# Allegro board SUB_TP2815_MCSI_V1_0_0418_1649.brd

Outline 52 x 66.97 mm; copper layers: TOP, L2GND, L3, BOTTOM. Coordinates in mm from the lower left corner of the outline.
Outline path: 0,66.97 0,0 52,0 52,66.97 0,66.97

## Design rules (mm)
net group MCSIA-CLKN: nets MCSIA-CLKN N16669400
net group MCSIA-CLKP: nets MCSIA-CLKP N16669297
net group MCSIA-D0N: nets MCSIA-D0N N16669496
net group MCSIA-D0P: nets MCSIA-D0P N16669492
net group MCSIA-D1N: nets MCSIA-D1N N16669588
net group MCSIA-D1P: nets MCSIA-D1P N16669584
net group MCSIA-D2N: nets MCSIA-D2N N16669680
net group MCSIA-D2P: nets MCSIA-D2P N16669676
net group MCSIA-D3N: nets MCSIA-D3N N16669772
net group MCSIA-D3P: nets MCSIA-D3P N16669768
net group VDD-IO-3V3: nets N16769015 VDD-IO-3V3
net group VIN1: nets N16649943 VIN1
net group VIN2: nets N16657022 VIN2
net group VIN3: nets N16657104 VIN3
net group VIN4: nets N16657188 VIN4

## Placement (name value [footprint] x y rotation side)
C1  100nF  [C0402]  24.83 38.8 270 bottom
C2  100nF  [C0402]  21.25 34.18 270 top
C3  100nF  [C0402]  23.43 28.52 270 bottom
C4  100nF  [C0402]  22.42 34.18 270 top
C5  100nF  [C0402]  30.9 38.83 270 bottom
C6  100nF  [C0402]  28.9 38.83 270 bottom
C7  100nF  [C0402]  26.89 38.83 270 bottom
C8  100nF  [C0402]  26.05 28.39 270 bottom
C9  100nF  [C0402]  27.4 28.39 270 bottom
C10  100nF  [C0402]  28.72 28.42 270 bottom
C11  100nF  [C0402]  29.91 28.42 270 bottom
C12  100nF  [C0402]  32.3 36.87 180 bottom
C13  NC/1uF  [C0402]  11.01 36.37 270 top
C14  NC/1uF  [C0402]  16.2 35.98 270 top
C15  100nF  [C0402]  22.42 36.19 270 top
C16  100nF  [C0402]  21.25 36.19 270 top
C17  100nF  [C0402]  34.74 32.89 0 bottom
C18  100nF  [C0402]  35.09 31.24 90 top
C19  100nF  [C0402]  34.74 34.08 0 bottom
C20  100nF  [C0402]  34.74 35.25 0 bottom
C21  100nF  [C0402]  24.98 41.06 90 bottom
C22  100nF  [C0402]  24.1 41.06 90 bottom
C23  100nF  [C0402]  30.06 41.06 90 bottom
C24  100nF  [C0402]  27.91 41.06 90 bottom
C25  100nF  [C0402]  26.13 41.06 90 bottom
C26  100nF  [C0402]  31.97 41.06 90 bottom
C27  NC/100nF  [C0402]  11.01 34.46 90 top
C28  100nF  [C0402]  31.18 28.36 270 bottom
C29  100nF  [C0402]  21.73 32.84 180 top
C30  100nF  [C0402]  22.14 29.58 270 bottom
C31  100nF  [C0402]  33.62 36.8 90 bottom
C32  100nF  [C0402]  35.6 29.33 90 top
C33  100nF  [C0402]  30.95 42.33 270 top
C34  100nF  [C0402]  31.84 42.33 270 top
C35  100nF  [C0402]  29.05 42.33 270 top
C36  100nF  [C0402]  26.06 52.32 90 top
C37  100nF  [C0402]  29.94 42.33 270 top
C38  100nF  [C0402]  38.69 52.32 90 top
C39  100nF  [C0402]  26.76 42.33 270 top
C40  100nF  [C0402]  27.78 42.33 270 top
C41  100nF  [C0402]  24.35 42.36 270 top
C42  100nF  [C0402]  25.24 42.36 270 top
C43  NC/100nF  [C0402]  21.43 30.78 180 top
C44  100nF  [C0402]  14.18 52.79 90 top
C45  100nF  [C0402]  4.54 46.95 90 top
C46  NC/100nF  [C0402]  36.72 23.84 180 top
C47  NC/20PF  [C0402]  34.99 25.42 90 top
C48  NC/20PF  [C0402]  35.02 27.32 270 top
C49  10uF  [C0402]  41.01 19.65 270 top
CC1  100nF  [C0402]  24.37 14.19 0 top
CC2  10uF  [C0402]  24.37 13.3 0 top
CC3  100nF  [C0402]  23.38 11.78 0 top
CC4  100nF  [C0402]  20.44 11.83 0 top
CC5  10uF  [C0603]  20.11 12.87 0 top
CC6  100nF  [C0402]  16.64 11.62 0 top
CC7  10uF  [C0603]  16.42 12.72 0 top
CP1  22uF-6.3V  [C0805]  21 38.98 0 top
CP2  22uF-6.3V  [C0805]  23.97 26.08 90 top
CP3  22uF-6.3V  [C0805]  19.02 34.56 0 top
CP4  22uF-6.3V  [C0805]  19.02 36.62 0 top
CP5  22uF-6.3V  [C0805]  38.01 35.48 180 top
CP6  22uF-6.3V  [C0805]  21 40.63 0 top
CP7  22uF-6.3V  [C0805]  18.48 27.96 180 top
CP8  22uF-6.3V  [C0805]  36.92 29.86 270 top
ESD1  ST5VLBD322  [SOD130_175H101]  44.29 46.74 180 top
ESD2  ST5VLBD322  [SOD130_175H101]  31.97 46.91 180 top
ESD3  ST5VLBD322  [SOD130_175H101]  19.65 47.03 180 top
ESD4  ST5VLBD322  [SOD130_175H101]  7.42 46.99 180 top
FB1  600R@100M-1A  [L0603]  15.59 39.59 0 top
FB2  600R@100M-1A  [L0603]  21.68 27.04 0 top
FB3  600R@100M-1A  [L0603]  19.17 33.14 0 top
FB4  600R@100M-1A  [L0603]  15.56 38.27 0 top
FB5  600R@100M-1A  [L0603]  37.79 34.03 180 top
FB6  600R@100M-1A  [L0603]  15.71 41.57 0 top
FB7  600R@100M-1A  [L0603]  15.38 27.93 0 top
FB8  600R@100M-1A  [L0603]  38.5 29.63 270 top
FB9  90@100M  [R0805]  20.74 15.21 90 top
FB10  90@100M  [R0805]  17.39 15 90 top
FB11  120R@100M-1A  [L0603]  26.12 48.62 270 bottom
FB12  120R@100M-1A  [L0603]  26.18 54.6 90 top
FB13  NC/60R@100M  [L0603]  37 22.78 180 top
H1  NC-HOLE  [MTH635D320]  43.79 5.24 0 top
H2  NC-HOLE  [MTH635D320]  8.21 21.01 0 top
J1  DIP  [BMW8B600_1890H700]  44.55 58.46 180 top
J2  DIP  [BMW8B600_1890H700]  32.27 58.46 180 top
J3  DIP  [BMW8B600_1890H700]  19.99 58.46 180 top
J4  DIP  [BMW8B600_1890H700]  7.71 58.46 180 top
JC1  DF40C-90DP-0.4V(58)  [SED90P40B185_1952H114-P]  26 13.12 180 bottom
NOREF  -  [unnamed]  49.93 3.93 0 top
NOREF#2  -  [#2]  6.7 2.96 0 top
NOREF#3  -  [#2]  -11.21 -26.5 0 top
NOREF#4  -  [#2]  0 66.97 0 top
NOREF#5  -  [unnamed]  2.05 57.35 0 top
NOREF#6  -  [#2]  52 0 90 top
NOREF#7  -  [unnamed]  4.03 5.25 0 top
NOREF#8  -  [#2]  -0.42 -5.42 0 top
NOREF#9  -  [unnamed]  49.04 63.26 0 top
NOREF#10  -  [unnamed]  4.03 5.25 180 bottom
NOREF#11  -  [unnamed]  2.05 57.35 180 bottom
NOREF#12  -  [unnamed]  49.04 63.26 180 bottom
NOREF#13  -  [unnamed]  49.93 3.93 180 bottom
OSC1  NC/27MHz/3225/20ppm  [X4B250_320H120_SMD]  37.07 26.18 180 top
Q1  BSN20  [SOT3P95B130_290H103]  43.25 26.89 270 top
Q2  BSN20  [SOT3P95B130_290H103]  43.21 31.73 180 top
Q3  MMBT3904  [SOT3P95B130_290H103]  43.24 22.46 270 top
R1  NC/1K  [R0402]  10.13 35.1 90 top
R2  24.9R  [R0402]  26.25 26.46 90 top
R3  24.9R  [R0402]  25.37 26.46 90 top
R4  24.9R  [R0402]  27.52 24.43 90 top
R5  24.9R  [R0402]  26.64 24.43 90 top
R6  24.9R  [R0402]  28.79 26.59 90 top
R7  24.9R  [R0402]  27.91 26.59 90 top
R8  24.9R  [R0402]  30.32 24.55 90 top
R9  24.9R  [R0402]  29.43 24.55 90 top
R10  24.9R  [R0402]  31.84 26.46 90 top
R11  24.9R  [R0402]  30.95 26.46 90 top
R12  100R  [R0402]  21.43 31.67 0 top
R13  100R  [R0402]  21.4 29.43 0 top
R14  22R  [R0402]  33.24 27.27 270 bottom
R15  NC/0R  [R0402]  33.67 27.76 0 top
R16  NC/0R  [R0402]  32.96 26.26 270 top
R17  NC/4.7K  [R0402]  36.03 37.15 0 bottom
R18  NC/4.7K  [R0402]  36.03 38.04 0 bottom
R19  NC/4.7K  [R0402]  42.87 29.08 0 top
R20  4.7K  [R0402]  18.79 31.24 270 top
R21  4.7K  [R0402]  36.03 37.15 180 top
R22  4.7K  [R0402]  36.03 38.04 180 top
R23  NC/22R  [R0402]  33.37 24.81 0 top
R24  NC/1M  [R0402]  33.8 26.26 90 top
R25  NC/0R  [R0402]  19.68 31.24 90 top
R26  NC/4.7K  [R0402]  45.42 31.82 270 top
R27  4.7K  [R0402]  19.24 29.43 180 top
R28  4.7K  [R0402]  41.01 23.51 90 top
R29  10K  [R0402]  45.76 23.84 90 top
R30  4.7K  [R0402]  43.55 19.2 0 top
R31  0R  [R0402]  43.55 20.08 180 top
R32  NC/0R  [R0402]  40.95 32.26 270 top
R33  NC/0R  [R0402]  41.01 21.59 270 top
R34  NC/0R  [R0603]  9.85 37.64 90 top
R35  0R  [R0603]  23.33 16.68 270 top
RC1  75R  [R0402]  44.8 45.26 180 top
RC2  0R  [R0402]  40.1 21.56 270 top
RC3  75R  [R0402]  32.6 45.51 180 top
RC4  0R  [R0402]  25.76 13.72 270 top
RC5  75R  [R0402]  20.34 45.64 180 top
RC6  75R  [R0402]  8.09 45.51 180 top
TP1  MCSI-FSIN0  [TP30]  28.39 10 0 top
TP2  MCSI-FSIN0  [TP30]  23.84 28.36 180 top
U1  NC/TPRT9013-12GB / WL2803E12-5/TR  [SOT5P95B160_300H130]  13.81 35.48 0 top
U2  TP2815  [QFN89P40B1000_1000H85_A]  28.67 34.46 270 top

## Library data of the parts
C1-C32 C34 C37 C40 C42 C43 C49 = CAPACITOR_0: room: LVDS
C33 C35 C39 C41 = CAPACITOR_0: signal model: CAPACITOR_0_C0402_100NF_100nF; room: LVDS
C36 C38 C44-C48 = C-C0402
CC1-CC7 = CAPACITOR_0
CP1-CP8 = CAP NP
ESD1-ESD4 = 1_1.5KE100A
FB1-FB8 FB11 FB12 = FERRITE BEAD_0
FB9 FB10 = INDUCTOR_3
FB13 = INDUCTOR: signal model: DEFAULT_INDUCTOR_0.001nH_1_2
H1 H2 = HOLE
J1-J4 = DIP-4PIN-360_6
JC1 = MIPI_90_CON_F_0
OSC1 = OSC
Q1 Q2 = BSN20_0
Q3 = NPN-MMBT3904_0
R1 R12-R16 R34 R35 = R-R0603
R2-R11 = R-R0603: signal model: R-R0603_R0402_24.9R_24.9R
R17-R33 = R-R0402-5%
RC1-RC6 = R
TP1 TP2 = TEST POINT SURFACE
U1 = LTC3406B-1_4.2
U2 = TP2856_0

## Footprints (pads in the part's own frame, mm; a bottom-side part is the same pattern mirrored in y, then rotated)
BMW8B600_1890H700
  round 2.2 hole 2.2 unplated: (0,-0.05) (0,-6.15)
  round 1.2 hole 0.8: 1(0.8,7.25) 2(-0.8,7.25) 3(-0.8,5.25) 4(0.8,5.25)
  rect 1.4x2.5 hole 0.7x1.3: 5(2.9,7.5) 6(-2.9,7.5) 7(-2.9,-2.3) 8(2.9,-2.3)
C0402
  rect 0.5x0.5 smd: 1(-0.425,0) 2(0.425,0)
C0603
  rect 0.76x0.76 smd: 1(-0.71,0) 2(0.71,0)
C0805
  rect 0.9x1.3 smd: 1(-0.95,0) 2(0.95,0)
L0603
  rect 0.76x0.76 smd: 1(-0.71,0) 2(0.71,0)
MTH635D320
  round 6.35 hole 3.2: 1(0,0)
QFN89P40B1000_1000H85_A
  rect 0.63x0.2 smd: 1(-4.885,4.2) 2(-4.885,3.8) 3(-4.885,3.4) 4(-4.885,3) 5(-4.885,2.6) 6(-4.885,2.2) 7(-4.885,1.8) 8(-4.885,1.4) 9(-4.885,1) 10(-4.885,0.6) 11(-4.885,0.2) 12(-4.885,-0.2) 13(-4.885,-0.6) 14(-4.885,-1) 15(-4.885,-1.4) 16(-4.885,-1.8) 17(-4.885,-2.2) 18(-4.885,-2.6) 19(-4.885,-3) 20(-4.885,-3.4) 21(-4.885,-3.8) 22(-4.885,-4.2) 45(4.885,-4.2) 46(4.885,-3.8) 47(4.885,-3.4) 48(4.885,-3) 49(4.885,-2.6) 50(4.885,-2.2) 51(4.885,-1.8) 52(4.885,-1.4) 53(4.885,-1) 54(4.885,-0.6) 55(4.885,-0.2) 56(4.885,0.2) 57(4.885,0.6) 58(4.885,1) 59(4.885,1.4) 60(4.885,1.8) 61(4.885,2.2) 62(4.885,2.6) 63(4.885,3) 64(4.885,3.4) 65(4.885,3.8) 66(4.885,4.2)
  rect 0.2x0.63 smd: 23(-4.2,-4.885) 24(-3.8,-4.885) 25(-3.4,-4.885) 26(-3,-4.885) 27(-2.6,-4.885) 28(-2.2,-4.885) 29(-1.8,-4.885) 30(-1.4,-4.885) 31(-1,-4.885) 32(-0.6,-4.885) 33(-0.2,-4.885) 34(0.2,-4.885) 35(0.6,-4.885) 36(1,-4.885) 37(1.4,-4.885) 38(1.8,-4.885) 39(2.2,-4.885) 40(2.6,-4.885) 41(3,-4.885) 42(3.4,-4.885) 43(3.8,-4.885) 44(4.2,-4.885) 67(4.2,4.885) 68(3.8,4.885) 69(3.4,4.885) 70(3,4.885) 71(2.6,4.885) 72(2.2,4.885) 73(1.8,4.885) 74(1.4,4.885) 75(1,4.885) 76(0.6,4.885) 77(0.2,4.885) 78(-0.2,4.885) 79(-0.6,4.885) 80(-1,4.885) 81(-1.4,4.885) 82(-1.8,4.885) 83(-2.2,4.885) 84(-2.6,4.885) 85(-3,4.885) 86(-3.4,4.885) 87(-3.8,4.885) 88(-4.2,4.885)
  rect 5.4x5.4 smd: 89(0,0)
R0402
  rect 0.5x0.5 smd: 1(-0.425,0) 2(0.425,0)
R0603
  rect 0.76x0.76 smd: 1(-0.71,0) 2(0.71,0)
R0805
  rect 0.9x1.3 smd: 1(-0.95,0) 2(0.95,0)
SED90P40B185_1952H114-P
  rect 0.23x0.66 smd: 1(-8.8,1.355) 2(-8.8,-1.355) 3(-8.4,1.355) 4(-8.4,-1.355) 5(-8,1.355) 6(-8,-1.355) 7(-7.6,1.355) 8(-7.6,-1.355) 9(-7.2,1.355) 10(-7.2,-1.355) 11(-6.8,1.355) 12(-6.8,-1.355) 13(-6.4,1.355) 14(-6.4,-1.355) 15(-6,1.355) 16(-6,-1.355) 17(-5.6,1.355) 18(-5.6,-1.355) 19(-5.2,1.355) 20(-5.2,-1.355) 21(-4.8,1.355) 22(-4.8,-1.355) 23(-4.4,1.355) 24(-4.4,-1.355) 25(-4,1.355) 26(-4,-1.355) 27(-3.6,1.355) 28(-3.6,-1.355) 29(-3.2,1.355) 30(-3.2,-1.355) 31(-2.8,1.355) 32(-2.8,-1.355) 33(-2.4,1.355) 34(-2.4,-1.355) 35(-2,1.355) 36(-2,-1.355) 37(-1.6,1.355) 38(-1.6,-1.355) 39(-1.2,1.355) 40(-1.2,-1.355) 41(-0.8,1.355) 42(-0.8,-1.355) 43(-0.4,1.355) 44(-0.4,-1.355) 45(0,1.355) 46(0,-1.355) 47(0.4,1.355) 48(0.4,-1.355) 49(0.8,1.355) 50(0.8,-1.355) 51(1.2,1.355) 52(1.2,-1.355) 53(1.6,1.355) 54(1.6,-1.355) 55(2,1.355) 56(2,-1.355) 57(2.4,1.355) 58(2.4,-1.355) 59(2.8,1.355) 60(2.8,-1.355) 61(3.2,1.355) 62(3.2,-1.355) 63(3.6,1.355) 64(3.6,-1.355) 65(4,1.355) 66(4,-1.355) 67(4.4,1.355) 68(4.4,-1.355) 69(4.8,1.355) 70(4.8,-1.355) 71(5.2,1.355) 72(5.2,-1.355) 73(5.6,1.355) 74(5.6,-1.355) 75(6,1.355) 76(6,-1.355) 77(6.4,1.355) 78(6.4,-1.355) 79(6.8,1.355) 80(6.8,-1.355) 81(7.2,1.355) 82(7.2,-1.355) 83(7.6,1.355) 84(7.6,-1.355) 85(8,1.355) 86(8,-1.355) 87(8.4,1.355) 88(8.4,-1.355) 89(8.8,1.355) 90(8.8,-1.355)
  rect 0.35x0.66 smd: 91(-9.275,1.355) 92(-9.275,-1.355) 93(9.275,1.355) 94(9.275,-1.355)
SOD130_175H101
  rect 0.8x0.8 smd: 1(-1.1,0) 2(1.1,0)
SOT3P95B130_290H103
  rect 0.95x0.46 smd: 1(-0.975,0.95) 2(-0.975,-0.95) 3(0.975,0)
SOT5P95B160_300H130
  rect 0.8x0.55 smd: 1(-1.2,0.95) 2(-1.2,0) 3(-1.2,-0.95) 4(1.2,-0.95) 5(1.2,0.95)
TP30
  round 0.3 smd: 1(0,0)
unnamed
  round 0.76 smd: (0,0)
X4B250_320H120_SMD
  rect 0.95x1.2 smd: 1(-0.875,1.1) 2(-0.875,-1.1) 3(0.875,-1.1) 4(0.875,1.1)

## Nets
DVDD-CSI: CC3.2 JC1.56(P56) JC1.58(P58) R35.2
GND: C1.2 C2.2 C3.2 C4.2 C5.2 C6.2 C7.2 C8.2 C9.2 C10.2 C11.2 C12.2 C13.2 C14.2 C15.2 C16.2 C17.2 C18.2 C19.2 C20.2 C21.2 C22.2 C23.2 C24.2 C25.2 C26.2 C27.2 C28.2 C29.2 C30.2 C31.2 C32.2 C34.1 C36.1 C37.1 C38.1 C40.1 C42.1 C43.2 C44.1 C45.1 C46.1 C47.1 C48.1 C49.2 CC1.1 CC2.1 CC3.1 CC4.1 CC5.1 CC6.1 CC7.1 CP1.1 CP2.1 CP3.1 CP4.1 CP5.1 CP6.1 CP7.1 CP8.1 ESD1.2(CATHODE) ESD2.2(CATHODE) ESD3.2(CATHODE) ESD4.2(CATHODE) FB11.2 FB12.2 H1.1 H2.1 J1.5(GND0) J1.6(GND1) J1.7(GND2) J1.8(GND3) J2.5(GND0) J2.6(GND1) J2.7(GND2) J2.8(GND3) J3.5(GND0) J3.6(GND1) J3.7(GND2) J3.8(GND3) J4.5(GND0) J4.6(GND1) J4.7(GND2) J4.8(GND3) JC1.1(P1) JC1.7(P7) JC1.10(P10) JC1.13(P13) JC1.14(P14) JC1.18(P18) JC1.19(P19) JC1.20(P20) JC1.25(P25) JC1.26(P26) JC1.28(P28) JC1.30(P30) JC1.31(P31) JC1.36(P36) JC1.37(P37) JC1.40(P40) JC1.42(P42) JC1.43(P43) JC1.46(P46) JC1.49(P49) JC1.50(P50) JC1.54(P54) JC1.55(P55) JC1.60(P60) JC1.61(P61) JC1.62(P62) JC1.64(P64) JC1.67(P67) JC1.73(P73) JC1.74(P74) JC1.76(P76) JC1.78(P78) JC1.79(P79) JC1.80(P80) JC1.82(P82) JC1.85(P85) JC1.91(P91) JC1.92(P92) JC1.93(P93) JC1.94(P94) OSC1.2(GND) R21.1 R22.1 RC1.2 RC3.2 RC5.2 RC6.2 U1.2(GND) U2.47(TEST) U2.89(EPAD)
VCC-1V2: C14.1 FB2.1 FB3.1 FB5.1 FB6.1 FB8.1 R35.1 U1.5(VOUT)
VCC-3V3-EXTSYS: FB1.1 FB4.1 FB7.1 FB10.2 R34.2
VCC-5V: C36.2 C38.2 C44.2 C45.2 FB9.2 J1.4(VCC) J2.4(VCC) J3.4(VCC) J4.4(VCC)
VCC-IO-SOC: CC1.2 CC2.2 JC1.52(P52) Q1.1(GATE) Q2.1(GATE) R19.2 R26.2 R28.2 R29.2
VDD-IO-3V3: C28.1 C29.1 C30.1 C31.1 CP7.2 FB7.2 FB13.1 R17.2 R18.2 R20.2 R27.2 R30.2 U2.35(VDD_IO1) U2.44(VDD_IO2) U2.63(VDD_IO3) U2.81(VDD_IO4)
VDD-PLL-1V2: C32.1 CP8.2 FB8.2 U2.66(VDDPLL)
VDDM-1V2A: C8.1 C9.1 C10.1 C11.1 CP2.2 FB2.2 U2.49(VDDM_1) U2.54(VDDM_2) U2.57(VDDM_3) U2.60(VDDM_4)
VDDM-1V2B: C17.1 C18.1 C19.1 C20.1 CP5.2 FB5.2 U2.67(VDDM_5) U2.72(VDDM_6) U2.75(VDDM_7) U2.78(VDDM_8)
VIN1: C33.1 ESD1.1(ANODE) J1.2(CVBS) RC1.1
VIN2: C35.1 ESD2.1(ANODE) J2.2(CVBS) RC3.1
VIN3: C39.1 ESD3.1(ANODE) J3.2(CVBS) RC5.1
VIN4: C41.1 ESD4.1(ANODE) J4.2(CVBS) RC6.1
MCSIA-CLKN: JC1.15(P15) R3.1
MCSIA-CLKP: JC1.17(P17) R2.1
MCSIA-D0N: JC1.9(P9) R5.1
MCSIA-D0P: JC1.11(P11) R4.1
MCSIA-D1N: JC1.21(P21) R7.1
MCSIA-D1P: JC1.23(P23) R6.1
MCSIA-D2N: JC1.3(P3) R9.1
MCSIA-D2P: JC1.5(P5) R8.1
MCSIA-D3N: JC1.27(P27) R11.1
MCSIA-D3P: JC1.29(P29) R10.1
MCSIA-MCLK: JC1.12(P12) R14.2
MCSIA-PWDN: RC4.1
MCSIA-RESET: Q3.2(E) R28.1 R33.1 RC2.1
MCSIA-SCK: JC1.8(P8) Q1.2(SOURCE) R19.1 R25.1
MCSIA-SDA: JC1.6(P6) Q2.2(SOURCE) R26.1 R32.1
S_GND: FB11.1 J1.1(GND) J2.1(GND) J3.1(GND) J4.1(GND)
SS_GND: FB12.1 J1.3(DET) J2.3(DET) J3.3(DET) J4.3(DET)
TP-AAVDD-3V3: C15.1 C16.1 CP4.2 FB4.2 U2.28(AADVDD) U2.29(ADAVDD)
TP-AVDD-1V2: C21.1 C22.1 C23.1 C24.1 C25.1 C26.1 CP6.2 FB6.2 U2.3(AVDD1_1) U2.8(AVDD1_2) U2.13(AVDD1_3) U2.18(AVDD1_4)
TP-AVDD-3V3: C1.1 C5.1 C6.1 C7.1 CP1.2 FB1.2 U2.6(AVDD3_1) U2.11(AVDD3_2) U2.16(AVDD3_3) U2.21(AVDD3_4)
TP-DVDD-1V2: C2.1 C3.1 C4.1 C12.1 CP3.2 FB3.2 U2.31(DVDD1) U2.45(DVDD2) U2.82(DVDD3)
TP-RSTB: R31.1 U2.41(RSTB)
TP-SAD0: R17.1 R21.2 U2.83(SAD0)
TP-SAD1: R18.1 R22.2 U2.84(SAD1)
TP-SCK: Q1.3(DRAIN) R12.1 R20.1 R25.2
TP-SDA: Q2.3(DRAIN) R13.1 R27.1 R32.2
TP-X27MI: C48.2 OSC1.3(OUT) R15.2 R24.2
TP-X27MO: R16.2 R23.1 R24.1
N16649943: C33.2 U2.7(VIN1)
N16657022: C35.2 U2.12(VIN2)
N16657104: C39.2 U2.17(VIN3)
N16657188: C41.2 U2.22(VIN4)
N16658195: C34.2 U2.5(VIN1N)
N16659361: C37.2 U2.10(VIN2N)
N16660016: C40.2 U2.15(VIN3N)
N16660671: C42.2 U2.20(VIN4N)
N16669297: R2.2 U2.51(CKP_1)
N16669400: R3.2 U2.50(CKN_1)
N16669492: R4.2 U2.53(D0P_1)
N16669496: R5.2 U2.52(D0N_1)
N16669584: R6.2 U2.56(D1P_1)
N16669588: R7.2 U2.55(D1N_1)
N16669676: R8.2 U2.59(D2P_1)
N16669680: R9.2 U2.58(D2N_1)
N16669768: R10.2 U2.62(D3P_1)
N16669772: R11.2 U2.61(D3N_1)
N16670000: C43.1 R12.2 U2.42(SCL)
N16670004: R13.2 U2.43(SDA)
N16672838: R14.1 R15.1 U2.65(XTI)
N16689695: TP2.1(TP) U2.46(IRQ)
N16690528: R16.1 U2.64(XTO)
N16706462: JC1.34(P34) TP1.1(TP)
N16706674: CC4.2 CC5.2 FB9.1 JC1.66(P66) JC1.68(P68) JC1.70(P70) JC1.72(P72)
N16706722: CC6.2 CC7.2 FB10.1 JC1.84(P84) JC1.86(P86) JC1.88(P88) JC1.90(P90)
N16706902: JC1.48(P48) RC4.2
N16707356: JC1.16(P16) RC2.2
N16711536: C49.1 Q3.3(C) R30.1 R31.2 R33.2
N16711748: Q3.1(B) R29.1
N16739722: C13.1 R1.2 R34.1 U1.1(VIN)
N16739750: C27.1 R1.1 U1.3(CE)
N16769015: C46.2 FB13.2 OSC1.4(VCC)
N16769019: C47.2 OSC1.1(NC) R23.2

Pads without a net: JC1 2 4 22 24 32 33 35 38 39 41 44 45 47 51 53 57 59 63 65 69 71 75 77 81 83 87 89; U1 4; U2 1 2 4 9 14 19 23 24 25 26 27 30 32 33 34 36 37 38 39 40 48 68 69 70 71 73 74 76 77 79 80 85 86 87 88

## Via types
v1: diameter 0.406, hole 0.203, TOP to BOTTOM, 630 vias

## Routing (per net, layer and track width the routed paths; a pad name or vN(x,y) marks a point on that pad's centre or on a via; arc(x,y) is an arc through that point)
DVDD-CSI: length 5.8
  TOP w0.508: v1(23.82,12.52) 23.48,12.52 22.97,13.02 22.97,14.54 23.33,14.9 23.33,15.97
  BOTTOM w0.229: JC1.56 24,12.33 v1(23.82,12.52) 23.6,12.3 JC1.58
GND: length 489
  TOP w0.198: v1(21.83,35.76) C16.2
  TOP w0.203: C43.2 v1(21,30.28) ; U2.47 v1(25.27,30.32)
  TOP w0.229: v1(16.2,10.97) 16.21,10.98 CC6.1 ; v1(15.97,13.51) 15.71,13.25 15.71,13.23 ; 15.71,13.23 CC7.1 v1(15,12.72) ; 15.71,13.23 v1(15.43,13.51) ; CC3.1 22.96,11.28 v1(22.72,11.04) ; CC4.1 19.4,12.44 CC5.1 19.4,13.38 v1(19.22,13.56)
  TOP w0.254: OSC1.2 37.68,27.28 36.82,28.14 35.41,28.14 C48.1 ; C37.1 v1(29.94,43.43) ; C42.1 v1(25.24,43.43) ; C34.1 v1(31.84,43.38) ; C40.1 v1(27.78,43.38)
  TOP w0.508: H2.1 8.21,24.37 ; H2.1 11.56,21.01 ; H2.1 8.21,17.66 ; H2.1 4.86,21.01 ; v1(35.78,32.25) 35.78,32.17 35.27,31.66 C18.2 ; C49.2 v1(41.01,18.56) ; 46.57,60.76 J1.7 ; J1.7 47.45,62.19 ; J1.7 47.45,59.34 ; J1.7 48.33,60.76 ; J1.6 48.33,50.96 ; J1.6 46.57,50.96 ; J1.6 47.45,52.39 ; J1.6 47.45,49.54 ; ESD3.2 v1(19.5,47.03) ; H1.1 43.79,8.59 ; H1.1 47.14,5.24 ; H1.1 40.44,5.24 ; H1.1 43.79,1.88 ; C44.1 v1(14.82,52.36) ; 41.65,59.34 J1.8 ; J1.8 40.77,60.76 ; J1.8 42.53,60.76 ; J1.8 41.65,62.19 ; J3.5 17.97,50.96 ; J3.5 16.21,50.96 ; J3.5 17.09,49.54 ; v1(11.73,35.12) 11.49,34.89 C27.2 ; v1(19.02,36.54) 18.14,36.54 CP4.1 ; 9.73,50.96 J4.6 ; J4.6 10.61,49.54 ; J4.6 11.49,50.96 ; CP5.1 v1(38.12,35.48) ; C48.1 v1(35.02,28.49) v1(33.8,28.49) ; v1(13.43,35.86) 13.05,35.48 ; 13.05,35.48 U1.2 ; 13.05,35.48 13.2,35.48 v1(13.4,35.27) ; ESD1.2 v1(44.07,46.74) ; v1(20.77,33.06) 21.08,33.06 C29.2 ; C32.2 v1(34.89,29.76) ; RC1.2 v1(44.37,44.6) ; J4.8 4.81,62.19 ; J4.8 5.69,60.76 ; J4.8 3.93,60.76 ; J4.8 4.81,59.34 ; 28.49,50.96 J2.5 ; J2.5 29.37,49.54 ; J2.5 30.25,50.96 ; CP6.1 v1(21,40.63) ; 29.37,59.34 J2.8 ; J2.8 29.37,62.19 ; J2.8 30.25,60.76 ; J2.8 28.49,60.76 ; J4.7 10.61,62.19 ; J4.7 10.61,59.34 ; J4.7 9.73,60.76 ; J4.7 11.49,60.76 ; C45.1 v1(3.88,46.53) ; C2.2 v1(21.78,33.76) C4.2 ; CP8.1 v1(36.92,29.89) ; OSC1.2 38.06,27.28 38.83,26.51 38.83,24.4 38.78,24.36 38.78,24.33 38.57,24.12 38.55,24.12 38.22,23.79 v1(37.81,23.79) 37.76,23.84 C46.1 ; CP1.1 v1(20.89,38.98) ; CP2.1 v1(23.97,26.08) ; 34.29,50.96 J2.6 ; J2.6 36.05,50.96 ; J2.6 35.17,49.54 ; v1(23.95,15.15) CC1.1 CC2.1 ; 16.21,60.76 J3.8 ; J3.8 17.97,60.76 ; J3.8 17.09,59.34 ; J3.8 17.09,62.19 ; J1.5 42.53,50.96 ; J1.5 40.77,50.96 ; J1.5 41.65,49.54 ; C38.1 v1(39.37,51.9) ; 22.01,60.76 J3.7 ; J3.7 22.89,59.34 ; J3.7 23.77,60.76 ; J3.7 22.89,62.19 ; v1(25.34,55.31) FB12.2 v1(27.12,55.31) ; C36.1 v1(26.75,51.9) ; C47.1 34.99,24.63 v1(35.37,24.25) ; 34.29,60.76 J2.7 ; J2.7 35.17,62.19 ; J2.7 36.05,60.76 ; J2.7 35.17,59.34 ; C14.2 v1(15.43,35.56) ; v1(18.99,34.66) 18.17,34.66 CP3.1 ; v1(22.98,35.91) 22.56,35.91 C15.2 ; C13.2 v1(11.59,35.94) ; RC3.2 v1(31.41,45.51) ; RC6.2 v1(6.98,45.51) ; ESD2.2 v1(31.64,46.91) ; RC5.2 v1(19.32,45.64) ; R22.1 v1(37.38,38.04) ; 22.01,50.96 J3.6 ; J3.6 23.77,50.96 ; J3.6 22.89,49.54 ; CP7.1 v1(18.66,27.96) ; 5.69,50.96 J4.5 4.81,49.54 ; ESD4.2 v1(7.2,46.99) ; R21.1 v1(37.33,37.15)
  L2GND w0.508: J2.6 36.05,50.96 ; J2.6 35.17,49.54 ; J2.6 34.29,50.96 ; J2.6 35.17,52.39 ; 4.81,59.34 J4.8 ; J4.8 4.81,62.19 ; J4.8 3.93,60.76 ; J4.8 5.69,60.76 ; H2.1 8.21,24.37 ; H2.1 8.21,17.66 ; H2.1 4.86,21.01 ; H2.1 11.56,21.01 ; J2.8 30.25,60.76 ; J2.8 29.37,62.19 ; J2.8 28.49,60.76 ; J2.8 29.37,59.34 ; H1.1 47.14,5.24 ; H1.1 43.79,8.59 ; H1.1 43.79,1.88 ; H1.1 40.44,5.24 ; 17.09,49.54 J3.5 ; J3.5 17.09,52.39 ; J3.5 16.21,50.96 ; J3.5 17.97,50.96 ; J2.7 35.17,62.19 ; J2.7 35.17,59.34 ; J2.7 34.29,60.76 ; J2.7 36.05,60.76 ; 10.61,49.54 J4.6 ; J4.6 9.73,50.96 ; J4.6 11.49,50.96 ; J4.6 10.61,52.39 ; J1.8 42.53,60.76 ; J1.8 41.65,62.19 ; J1.8 41.65,59.34 ; J1.8 40.77,60.76 ; J4.5 4.81,52.39 ; J4.5 5.69,50.96 ; J4.5 4.81,49.54 ; J4.5 3.93,50.96 ; J1.6 47.45,52.39 ; J1.6 48.33,50.96 ; J1.6 47.45,49.54 ; J1.6 46.57,50.96 ; 41.65,49.54 J1.5 ; J1.5 42.53,50.96 ; J1.5 41.65,52.39 ; J1.5 40.77,50.96 ; J1.7 48.33,60.76 ; J1.7 46.57,60.76 ; J1.7 47.45,59.34 ; J1.7 47.45,62.19 ; 9.73,60.76 J4.7 ; J4.7 11.49,60.76 ; J4.7 10.61,59.34 ; J4.7 10.61,62.19 ; J3.7 23.77,60.76 ; J3.7 22.01,60.76 ; J3.7 22.89,59.34 ; J3.7 22.89,62.19 ; 22.01,50.96 J3.6 ; J3.6 23.77,50.96 ; J3.6 22.89,52.39 ; J3.6 22.89,49.54 ; 28.49,50.96 J2.5 ; J2.5 29.37,49.54 ; J2.5 29.37,52.39 ; J2.5 30.25,50.96 ; J3.8 17.09,62.19 ; J3.8 17.09,59.34 ; J3.8 16.21,60.76 ; J3.8 17.97,60.76
  L3 w0.508: 41.65,59.34 J1.8 ; J1.8 40.77,60.76 ; J1.8 41.65,62.19 ; J1.8 42.53,60.76 ; 22.89,49.54 J3.6 ; J3.6 22.89,52.39 ; J3.6 23.77,50.96 ; J3.6 22.01,50.96 ; 4.81,59.34 J4.8 ; J4.8 5.69,60.76 ; J4.8 3.93,60.76 ; J4.8 4.81,62.19 ; 4.81,49.54 J4.5 ; J4.5 4.81,52.39 ; J4.5 3.93,50.96 ; J4.5 5.69,50.96 ; J1.7 48.33,60.76 ; J1.7 47.45,59.34 ; J1.7 46.57,60.76 ; J1.7 47.45,62.19 ; J1.5 42.53,50.96 ; J1.5 41.65,49.54 ; J1.5 41.65,52.39 ; J1.5 40.77,50.96 ; 4.86,21.01 H2.1 ; H2.1 11.56,21.01 ; H2.1 8.21,24.37 ; H2.1 8.21,17.66 ; J2.8 30.25,60.76 ; J2.8 29.37,62.19 ; J2.8 28.49,60.76 ; J2.8 29.37,59.34 ; J4.7 10.61,62.19 ; J4.7 11.49,60.76 ; J4.7 9.73,60.76 ; J4.7 10.61,59.34 ; J2.7 35.17,62.19 ; J2.7 35.17,59.34 ; J2.7 34.29,60.76 ; J2.7 36.05,60.76 ; J3.5 17.97,50.96 ; J3.5 16.21,50.96 ; J3.5 17.09,52.39 ; J3.5 17.09,49.54 ; J3.7 23.77,60.76 ; J3.7 22.01,60.76 ; J3.7 22.89,62.19 ; J3.7 22.89,59.34 ; 40.44,5.24 H1.1 ; H1.1 43.79,8.59 ; H1.1 47.14,5.24 ; H1.1 43.79,1.88 ; J4.6 11.49,50.96 ; J4.6 10.61,49.54 ; J4.6 10.61,52.39 ; J4.6 9.73,50.96 ; 34.29,50.96 J2.6 ; J2.6 36.05,50.96 ; J2.6 35.17,49.54 ; J2.6 35.17,52.39 ; J2.5 30.25,50.96 ; J2.5 29.37,52.39 ; J2.5 28.49,50.96 ; J2.5 29.37,49.54 ; 17.09,59.34 J3.8 ; J3.8 17.09,62.19 ; J3.8 16.21,60.76 ; J3.8 17.97,60.76 ; J1.6 47.45,52.39 ; J1.6 48.33,50.96 ; J1.6 47.45,49.54 ; J1.6 46.57,50.96
  BOTTOM w0.203: JC1.1 34.8,15.24 v1(34.84,15.28) ; JC1.25 v1(30,13.85) ; JC1.31 v1(28.8,13.85)
  BOTTOM w0.229: v1(30.13,11.07) 30.04,11.16 30.04,11.24 30,11.28 JC1.26 ; JC1.85 18,14.93 v1(18.38,15.31) ; v1(19.22,13.56) 19.22,13.51 18.8,13.09 JC1.82 ; JC1.80 v1(19.2,11.12) ; v1(19.2,11.12) 19.28,11.2 19.42,11.2 19.56,11.34 19.56,11.47 19.6,11.52 JC1.78 ; v1(19.2,11.12) 19.75,11.12 19.88,11.25 19.88,11.27 20,11.39 ; JC1.30 29.2,11.28 29.16,11.24 29.16,11.12 v1(29.05,11.02) ; JC1.49 25.2,14.92 v1(25.5,15.22) ; v1(35.5,15.18) 35.28,14.96 JC1.91 ; v1(23.95,15.15) 24,15.1 JC1.55 ; JC1.62 22.8,12.39 v1(22.7,12.49) 22.97,12.49 23.2,12.26 JC1.60 ; 20,11.39 JC1.76 ; 20,11.39 v1(20,11.12) 20.4,11.52 JC1.74 ; JC1.10 33.2,12.43 v1(33.37,12.59) ; JC1.13 32.4,13.94 v1(32.27,13.81) ; JC1.40 v1(27.2,11.05) ; v1(22.44,15.41) 22.8,15.05 JC1.61 ; JC1.73 v1(20.4,15.17) ; JC1.28 v1(29.6,11.05) ; JC1.79 v1(19.2,15.16) ; v1(35.32,11.14) 35.28,11.19 JC1.92 ; JC1.54 v1(24.4,10.99) ; JC1.18 v1(31.6,11.05) ; JC1.37 v1(27.6,15.21) ; JC1.93 v1(16.12,14.48) ; JC1.36 28,11.24 v1(27.83,11.07) ; JC1.20 v1(31.2,11.05) ; JC1.67 v1(21.6,15.18) ; JC1.14 v1(32.4,11.05) ; JC1.50 v1(25.2,11.05) ; v1(26.66,11.04) 26.76,11.14 26.76,11.24 26.8,11.28 JC1.42 ; JC1.46 v1(26,11.05) ; JC1.43 v1(26.4,15.19) ; v1(22.72,11.04) 22.4,11.37 JC1.64 ; JC1.19 v1(31.2,13.82) ; JC1.94 16.73,11.5 v1(16.2,10.97) ; JC1.7 v1(33.6,15.18)
  BOTTOM w0.508: J4.7 10.61,62.19 ; J4.7 10.61,59.34 ; J4.7 9.73,60.76 ; J4.7 11.49,60.76 ; 46.57,50.96 J1.6 ; J1.6 47.45,49.54 ; J1.6 48.33,50.96 ; J1.6 47.45,52.39 ; v1(28.01,28.14) 27.91,28.14 27.73,27.97 C9.2 ; H1.1 47.14,5.24 ; H1.1 40.44,5.24 ; H1.1 43.79,8.59 ; H1.1 43.79,1.88 ; v1(31.59,38.6) 31.59,38.58 31.42,38.4 C5.2 ; v1(25.92,42.18) 26.13,41.98 C25.2 25.93,41.29 25.18,41.29 C21.2 C22.2 v1(23.59,41.49) ; J1.5 42.53,50.96 ; J1.5 41.65,52.39 ; J1.5 40.77,50.96 ; C3.2 23.01,28.09 v1(22.83,27.91) ; 22.01,60.76 J3.7 ; J3.7 22.89,59.34 ; J3.7 22.89,62.19 ; J3.7 23.77,60.76 ; 4.81,49.54 J4.5 ; J4.5 5.69,50.96 ; J4.5 3.93,50.96 ; J4.5 4.81,52.39 ; 28.49,60.76 J2.8 ; J2.8 29.37,59.34 ; J2.8 30.25,60.76 ; J2.8 29.37,62.19 ; H2.1 11.56,21.01 ; H2.1 8.21,17.66 ; H2.1 4.86,21.01 ; H2.1 8.21,24.37 ; 41.65,59.34 J1.8 ; J1.8 41.65,62.19 ; J1.8 40.77,60.76 ; J1.8 42.53,60.76 ; v1(21.56,28.7) 21.68,28.7 C30.2 ; C17.2 v1(35.86,32.89) ; v1(25.52,38.6) 25.3,38.38 C1.2 ; J4.8 4.81,62.19 ; J4.8 4.81,59.34 ; J4.8 3.93,60.76 ; J4.8 5.69,60.76 ; C28.2 v1(31.94,27.94) ; C7.2 27.4,38.4 27.6,38.6 v1(27.68,38.6) ; 46.57,60.76 J1.7 ; J1.7 47.45,59.34 ; J1.7 48.33,60.76 ; J1.7 47.45,62.19 ; FB11.2 v1(27.06,47.91) ; J2.5 29.37,52.39 ; J2.5 28.49,50.96 ; J2.5 30.25,50.96 ; 16.21,60.76 J3.8 ; J3.8 17.97,60.76 ; J3.8 17.09,59.34 ; J3.8 17.09,62.19 ; v1(30.95,36.75) 31.08,36.87 C12.2 ; C20.2 v1(35.86,35.25) ; J3.6 22.89,52.39 ; J3.6 23.77,50.96 ; J3.6 22.01,50.96 ; J4.6 11.49,50.96 ; J4.6 9.73,50.96 ; J4.6 10.61,52.39 ; J2.7 35.17,62.19 ; J2.7 36.05,60.76 ; J2.7 34.29,60.76 ; J2.7 35.17,59.34 ; C24.2 27.91,41.52 v1(28.39,42) 28.9,41.49 C23.2 30.48,41.49 v1(30.65,41.32) 30.82,41.49 C26.2 v1(32.71,41.49) ; J3.5 17.09,52.39 ; J3.5 16.21,50.96 ; J3.5 17.97,50.96 ; J2.6 35.17,52.39 ; J2.6 34.29,50.96 ; J2.6 36.05,50.96 ; C19.2 v1(35.86,34.08) ; C31.2 33.62,37.23 34.13,37.74 v1(34.18,37.74) ; C6.2 29.44,38.4 v1(29.66,38.63) ; C11.2 v1(30.51,27.99) ; C10.2 v1(29.27,27.99) ; v1(26.76,28.11) 26.62,27.97 C8.2
  vias: v1(0.73,66.24) v1(0.73,63.7) v1(0.73,61.16) v1(0.73,58.62) v1(0.73,56.08) v1(0.73,53.54) v1(0.73,51) v1(0.73,48.46) v1(0.73,45.92) v1(0.73,43.38) v1(0.73,40.84) v1(0.73,38.3) v1(0.73,35.76) v1(0.73,33.22) v1(0.73,30.68) v1(0.73,28.14) v1(0.73,25.6) v1(0.73,23.06) v1(0.73,20.52) v1(0.73,17.98) v1(0.73,15.44) v1(0.73,12.9) v1(0.73,10.36) v1(0.73,7.82) v1(0.73,5.28) v1(0.73,2.74) v1(0.73,0.73) v1(2.51,9.26) v1(2.51,7.08) v1(2.63,66.24) v1(3.01,64) v1(3.29,30.93) v1(3.29,28.39) v1(3.29,25.85) v1(3.29,23.31) v1(3.29,20.77) v1(3.29,18.23) v1(3.29,15.69) v1(3.29,13.15) v1(3.29,10.61) v1(3.37,2.76) v1(3.55,0.76) v1(4,55.52) v1(5.05,9.26) v1(5.05,7.08) v1(5.17,66.24) v1(5.81,44.65) v1(5.83,39.92) v1(5.91,2.76) v1(6.09,0.76) v1(6.14,36.24) v1(6.16,30.37) v1(6.16,27.83) v1(6.16,25.29) v1(6.16,15.13) v1(6.16,12.59) v1(6.16,10.05) v1(6.24,48.35) v1(6.57,49.8) v1(7.41,62.15) v1(7.46,55.97) v1(7.59,9.26) v1(7.59,7.08) v1(7.64,33.57) v1(7.71,66.24) v1(8.17,54.4) v1(8.3,42.69) v1(8.45,2.76) v1(8.53,39.72) v1(8.63,25.47) v1(8.63,0.76) v1(9.06,37.28) v1(9.19,15.16) v1(9.21,33.85) v1(9.72,12.46) v1(10.02,44.62) v1(10.13,9.26) v1(10.13,7.08) v1(10.25,66.24) v1(10.73,56.03) v1(10.99,2.76) v1(11.14,38.3) v1(11.17,0.76) v1(11.29,47.44) v1(11.8,41.22) v1(12.44,51.96) v1(12.67,9.26) v1(12.67,7.08) v1(12.79,66.24) v1(12.79,31.59) v1(12.79,23.97) v1(12.79,21.43) v1(12.79,18.89) v1(12.79,16.35) v1(12.79,13.81) v1(12.79,11.27) v1(12.87,50.26) v1(13.35,30.6) v1(13.48,56.66) v1(13.45,55.24) v1(13.61,60.27) v1(13.53,2.76) v1(13.66,63.65) v1(13.68,44.37) v1(13.71,0.76) v1(13.76,38.7) v1(13.86,41.88) v1(13.88,27.15) v1(14.01,40.63) v1(14.8,47.26) v1(15.18,50.26) v1(15.21,9.26) v1(15.21,7.08) v1(15.33,66.24) v1(15.33,51.53) v1(15.46,33.06) v1(15.43,29.41) v1(16.07,2.76) v1(16.3,40.63) v1(16.25,0.76) v1(16.48,26.66) v1(16.5,23.77) v1(16.55,17.6) v1(17.26,47.41) v1(17.24,45.26) v1(17.42,38.27) v1(17.75,9.26) v1(17.75,7.08) v1(17.87,66.24) v1(18.33,24.99) v1(18.38,17.39) v1(18.61,2.76) v1(18.74,40.68) v1(18.79,0.76) v1(18.84,39.31) v1(19.2,10.56) v1(19.27,49.62) v1(19.23,10.03) v1(19.7,44.16) v1(20,10.57) v1(20.11,24.63) v1(20.03,19.12) v1(20.03,10.03) v1(20.29,9.26) v1(20.29,7.08) v1(20.36,62.55) v1(20.41,66.24) v1(20.59,55.49) v1(20.95,39.77) v1(21.15,2.76) v1(21.33,0.76) v1(21.66,37.46) v1(22.04,48.61) v1(22.14,46.53) v1(22.52,16.78) v1(22.77,39.82) v1(22.85,44.09) v1(22.83,23.01) v1(22.83,9.26) v1(22.83,7.08) v1(22.95,66.24) v1(22.93,37.94) v1(23.38,18.92) v1(23.61,39.95) v1(23.61,10.43) v1(23.69,2.76) v1(23.87,0.76) v1(24.58,51.61) v1(24.6,50.72) v1(24.53,47.44) v1(24.6,34.44) v1(24.6,33.67) v1(24.6,32.91) v1(24.86,22.52) v1(25.09,46.04) v1(25.04,25.19) v1(25.26,19.58) v1(25.37,9.26) v1(25.37,7.08) v1(25.49,66.24) v1(26.1,57.02) v1(26.28,64) v1(26.23,60.62) v1(26.23,2.76) v1(26.38,36.75) v1(26.38,35.98) v1(26.38,35.22) v1(26.38,34.46) v1(26.38,33.7) v1(26.38,32.94) v1(26.38,32.17) v1(26.41,0.76) v1(26.79,13.25) v1(27.04,50.72) v1(27.02,44.93) v1(27.14,36.75) v1(27.14,35.98) v1(27.14,35.22) v1(27.14,34.46) v1(27.14,33.7) v1(27.14,32.94) v1(27.14,32.17) v1(27.24,17.37) v1(27.63,51.86) v1(27.91,36.75) v1(27.91,35.98) v1(27.91,35.22) v1(27.91,34.46) v1(27.91,33.7) v1(27.91,32.94) v1(27.91,32.17) v1(27.91,9.26) v1(27.91,7.08) v1(28.03,66.24) v1(28.46,13.1) v1(28.62,45.33) v1(28.67,36.75) v1(28.67,35.98) v1(28.67,35.22) v1(28.67,34.46) v1(28.67,33.7) v1(28.67,32.94) v1(28.67,32.17) v1(28.77,46.93) v1(28.77,2.76) v1(28.95,0.76) v1(29.2,48.3) v1(29.43,36.75) v1(29.43,35.98) v1(29.43,35.22) v1(29.43,34.46) v1(29.43,33.7) v1(29.43,32.94) v1(29.43,32.17) v1(30.19,36.75) v1(30.19,35.98) v1(30.19,35.22) v1(30.19,34.46) v1(30.19,33.7) v1(30.19,32.94) v1(30.19,32.17) v1(30.24,21.53) v1(30.45,9.26) v1(30.45,7.08) v1(30.57,66.24) v1(30.95,35.98) v1(30.95,35.22) v1(30.95,34.46) v1(30.95,33.7) v1(30.95,32.94) v1(30.95,32.17) v1(30.96,21.53) v1(30.95,13.05) v1(31.04,23.74) v1(31.31,2.76) v1(31.44,18.74) v1(31.49,0.76) v1(31.59,48.1) v1(31.61,35.25) v1(31.76,23.74) v1(31.87,49.55) v1(31.87,34.36) v1(31.87,33.6) v1(31.87,32.84) v1(32.16,18.74) v1(32.55,61.03) v1(32.63,55.92) v1(32.63,40.56) v1(32.68,38.5) v1(32.64,21.43) v1(32.81,34.28) v1(32.81,33.52) v1(32.81,32.76) v1(32.99,9.26) v1(32.99,7.08) v1(33.11,66.24) v1(33.36,21.43) v1(33.47,39.13) v1(33.65,18.64) v1(33.87,50.41) v1(33.84,23.23) v1(33.85,2.76) v1(34,41.9) v1(34.03,0.76) v1(34.43,47.82) v1(34.43,44.93) v1(34.56,38.52) v1(34.56,23.23) v1(35.07,21.15) v1(35.2,39.95) v1(35.53,9.26) v1(35.53,7.08) v1(35.65,66.24) v1(35.7,41.47) v1(36.39,2.76) v1(36.54,14.7) v1(36.57,0.76) v1(36.62,43.02) v1(36.9,47.95) v1(36.87,40.18) v1(36.87,21.43) v1(37.1,44.8) v1(37.07,27.09) v1(37.1,25.01) v1(37.13,17.16) v1(37.3,51.25) v1(37.43,21.46) v1(37.43,13.12) v1(37.61,32.94) v1(37.96,26.13) v1(38.09,57.02) v1(38.07,9.26) v1(38.07,7.08) v1(38.19,66.24) v1(38.19,36.7) v1(38.27,64) v1(38.22,60.62) v1(38.24,21.84) v1(38.27,19.2) v1(38.83,38.3) v1(38.93,2.76) v1(39.11,0.76) v1(39.13,41.75) v1(39.36,33.19) v1(39.44,29.69) v1(39.44,24.96) v1(39.41,16.96) v1(39.51,26.54) v1(40.02,48.02) v1(40.05,14.01) v1(40.15,43.02) v1(40.28,51.02) v1(40.25,22.88) v1(40.5,17.01) v1(40.61,9.26) v1(40.61,7.08) v1(40.66,45.1) v1(40.73,66.24) v1(40.83,39.77) v1(41.09,25.32) v1(41.39,29.18) v1(41.42,35.22) v1(41.47,2.76) v1(41.52,37.61) v1(41.52,33.78) v1(41.62,55.95) v1(41.65,11.78) v1(41.65,0.76) v1(41.77,30.35) v1(41.85,22.45) v1(41.82,21.15) v1(42.26,25.67) v1(42.84,50.62) v1(42.82,44.67) v1(43.02,32.25) v1(43.2,48.53) v1(43.27,66.24) v1(43.22,31.51) v1(43.25,23.41) v1(43.4,27.91) v1(43.4,17.34) v1(43.7,41.65) v1(44.14,29.25) v1(44.14,21.1) v1(44.19,0.76) v1(44.26,49.68) v1(44.26,25.82) v1(44.34,32.1) v1(44.36,9.47) v1(44.59,61.61) v1(44.64,36.7) v1(44.75,52.34) v1(44.87,34.26) v1(44.85,14.78) v1(45.02,43.35) v1(45.05,39.21) v1(45.1,27.3) v1(45.28,30.19) v1(45.41,26.08) v1(45.61,22.29) v1(45.81,66.24) v1(45.89,29.13) v1(45.94,44.62) v1(45.94,19.86) v1(46.09,52.37) v1(46.07,30.75) v1(46.14,55.97) v1(46.24,49.52) v1(46.4,47.54) v1(46.63,41.8) v1(46.73,26.99) v1(46.73,0.76) v1(46.93,16.68) v1(47.59,36.85) v1(47.92,31.34) v1(47.92,28.8) v1(47.92,26.26) v1(47.92,23.72) v1(47.92,21.18) v1(47.92,18.64) v1(47.92,16.1) v1(47.92,13.56) v1(47.92,11.02) v1(48.07,6.62) v1(48.35,66.24) v1(48.4,47.03) v1(48.86,34.05) v1(49.19,42.33) v1(49.27,0.76) v1(51.25,66.21) v1(51.25,63.67) v1(51.25,61.13) v1(51.25,58.59) v1(51.25,56.05) v1(51.25,53.51) v1(51.25,50.97) v1(51.25,48.43) v1(51.25,45.89) v1(51.25,43.35) v1(51.25,40.81) v1(51.25,38.27) v1(51.25,35.73) v1(51.25,33.19) v1(51.25,30.65) v1(51.25,28.11) v1(51.25,25.57) v1(51.25,23.03) v1(51.25,20.49) v1(51.25,17.95) v1(51.25,15.41) v1(51.25,12.87) v1(51.25,10.33) v1(51.25,7.79) v1(51.25,5.25) v1(51.25,2.71) v1(51.25,0.78)
VCC-1V2: length 71.9
  TOP w0.508: U1.5 15.03,36.41 C14.1 v1(16.2,37.25) ; v1(39.97,34.46) 39.54,34.03 FB5.1 38.5,34 38.5,34 FB8.1 ; v1(16.35,33.34) 18.25,33.34 FB3.1 ; FB2.1 20.54,27.04 19.68,26.18 v1(18.1,26.18) 19.02,25.27 19.02,24.17 21.94,21.25 21.94,19.22 23.33,17.82 R35.1 ; v1(15.36,40.68) 15,41.04 FB6.1
  L3 w0.508: v1(39.97,34.46) 39.97,38.3 35.53,42.74 17.42,42.74 v1(15.36,40.68) 15.36,38.55 16.2,37.71 v1(16.2,37.25) 16.35,37.1 v1(16.35,33.34) 16.22,33.22 16.22,27.76 17.8,26.18 v1(18.1,26.18)
VCC-3V3-EXTSYS: length 34.6
  TOP w0.508: FB4.1 14.88,38.3 FB1.1 11.09,39.59 R34.2 9.03,38.35 8.37,37.69 8.37,33.44 13.88,27.93 FB7.1 14.67,27.45 17.39,24.73 FB10.2
VCC-5V: length 56.3
  TOP w0.508: 18.41,52.87 J3.4 ; J3.4 18.41,53.21 ; J3.4 19.19,53.21 C44.2 10.34,53.21 9.36,52.23 7.89,52.23 J4.4 ; J3.4 20.17,52.23 21.55,52.23 22.06,52.75 C36.2 31.01,52.75 J2.4 ; 43.41,52.43 J1.4 ; J1.4 43.29,52.75 C38.2 34,52.75 33.49,52.23 32.45,52.23 J2.4 ; J1.4 42.97,53.21 ; J2.4 30.69,53.21 ; J2.4 30.69,52.87 ; J4.4 6.31,52.61 ; J4.4 4.11,53.21 3.39,52.49 3.39,49.57 4.54,48.43 C45.2 ; J4.4 6.91,52.44 ; v1(19.68,16.12) 20.71,16.12 FB9.2
  vias: v1(15.28,16.68) v1(15.26,16.12) v1(19.68,16.68)
VCC-IO-SOC: length 42.2
  TOP w0.508: v1(45.76,24.89) R29.2 41.34,24.27 R28.2 40.06,23.94 39.18,23.06 39.18,17.77 37.38,15.97 25.42,15.97 24.8,15.35 CC1.2 CC2.2 24.8,12.47 v1(24.8,12.46) ; R26.2 44.8,31.39 Q2.1 43.29,29.89 R19.2 44.2,28.17 Q1.1 44.31,27.98 v1(46.07,27.98)
  L3 w0.508: v1(46.07,27.98) 46.07,25.19 v1(45.76,24.89)
  BOTTOM w0.254: JC1.52 v1(24.8,12.46)
VDD-IO-3V3: length 73.1
  TOP w0.198: 23.1,33.59 23.37,33.86 U2.35 ; U2.81 33.22,35.86 v1(32.81,35.45) ; v1(23.05,30.02) 23.05,30.06 23.25,30.26 U2.44 ; U2.63 31.67,28.92 v1(31.74,28.85)
  TOP w0.508: v1(38.5,22.78) FB13.1 ; FB7.2 17.51,27.93 CP7.2 17.75,27.96 v1(18.35,28.57) 18.82,29.03 R27.2 18.79,29.46 R20.2 18.58,30.81 18.08,31.32 v1(18.08,32.17) ; v1(22.11,32.39) 22.16,32.43 C29.1 22.18,32.86 22.8,32.86 23.1,33.17 23.1,33.59 ; v1(44.75,19.2) R30.2
  L3 w0.508: v1(18.08,32.17) 18.29,32.39 v1(22.11,32.39) 22.11,33.27 26.15,37.31 31.18,37.31 31.84,36.65 31.84,36.29 32.68,35.45 v1(32.81,35.45) ; v1(31.74,28.85) 32.27,28.85 32.6,29.18 37.84,29.18 38.8,28.21 38.8,23.08 v1(38.5,22.78) 42.08,19.2 v1(44.75,19.2)
  BOTTOM w0.508: v1(18.35,28.57) 18.48,28.57 18.74,28.82 20.79,28.82 21.95,29.98 22.11,29.98 C30.1 22.62,30.01 22.63,30.02 v1(23.05,30.02) 24.07,30.02 24.6,29.48 30.8,29.48 31.18,29.1 C28.1 31.68,28.79 v1(31.74,28.85) ; v1(32.81,35.45) 33.09,35.45 33.59,35.96 33.59,36.35 C31.1 33.94,36.37 34.08,36.51 35.97,36.51 36.46,37 R17.2 R18.2
VDD-PLL-1V2: length 5.9
  TOP w0.198: U2.66 32.99,29.46
  TOP w0.508: FB8.2 38.49,28.91 CP8.2 35.61,28.91 C32.1 35.36,29.15 34.64,29.15 34.33,29.46 32.99,29.46
VDDM-1V2A: length 12.5
  TOP w0.198: U2.60 v1(30.47,28.85) ; U2.49 26.07,29.27 25.72,28.92 25.52,28.92 v1(25.42,28.82) ; U2.54 28.07,28.86 v1(28.11,28.82) ; U2.57 29.27,28.88 v1(29.33,28.82)
  TOP w0.508: v1(25.42,28.82) 23.97,27.37 CP2.2 22.41,27.03 FB2.2
  BOTTOM w0.508: v1(25.42,28.82) 25.42,28.82 C8.1 C9.1 v1(28.11,28.82) 28.13,28.84 C10.1 29.31,28.84 v1(29.33,28.82) 29.35,28.84 C11.1 30.36,28.84 30.36,28.85 v1(30.47,28.85)
VDDM-1V2B: length 13.8
  TOP w0.198: U2.78 v1(34.3,34.66) ; U2.72 v1(34.31,32.26) ; v1(34.31,33.42) 34.26,33.46 U2.75 ; 34.38,30.45 34.2,30.26 U2.67
  TOP w0.508: v1(34.31,35.88) 34.34,35.91 36.21,35.91 36.64,35.48 CP5.2 37.08,35.47 FB5.2 ; v1(34.31,32.26) 34.31,31.36 34.86,30.81 ; 34.86,30.81 34.74,30.81 34.38,30.45 ; 34.86,30.81 C18.1
  BOTTOM w0.508: v1(34.31,35.88) C20.1 34.31,34.67 v1(34.3,34.66) 34.3,34.09 C19.1 34.31,33.43 v1(34.31,33.42) 34.31,33.41 C17.1 34.31,32.27 v1(34.31,32.26)
VIN1: length 22.1
  TOP w0.206: C33.1 30.95,43.52 31.35,43.91 44.48,43.91 45.22,44.65 RC1.1 45.39,45.42 ESD1.1 45.39,51.18 J1.2
VIN2: length 12.1
  TOP w0.206: C35.1 29.05,43.31 29.05,44.09 29.73,44.77 32.91,44.77 33.11,44.98 33.11,45.43 RC3.1 33.07,45.56 33.07,46.27 33.07,46.28 ESD2.1 33.07,47 33.07,47 J2.2
VIN3: length 13.5
  TOP w0.206: J3.2 20.75,51.17 ESD3.1 20.76,47.02 RC5.1 21.62,44.77 25.95,44.77 26.76,43.96 C39.1
VIN4: length 28.9
  TOP w0.206: ESD4.1 8.52,46.99 RC6.1 ; ESD4.1 8.52,51.21 J4.2 8.51,46.99 ESD4.1 ; ESD4.1 8.52,45.51 RC6.1 ; RC6.1 8.52,44.93 10.07,43.38 24.14,43.38 24.35,43.17 C41.1
MCSIA-CLKN: length 17.5
  TOP w0.102: R3.1 25.66,25.74 25.66,21.04 29.3,17.39 31.69,17.39 32,17.7 32,18.05 v1(32.16,18.2)
  BOTTOM w0.102: JC1.15 32,18.04 v1(32.16,18.2)
MCSIA-CLKP: length 17.4
  TOP w0.102: R2.1 25.96,25.74 25.96,21.16 26.18,20.95 26.47,20.95 26.68,20.73 26.68,20.45 27.99,19.13 28.28,19.13 28.5,18.92 28.5,18.63 28.71,18.42 29,18.42 29.21,18.2 29.21,17.91 29.43,17.7 29.73,17.7 29.94,17.9 30.24,17.9 30.45,17.7 31.56,17.7 31.7,17.83 31.7,18.1 31.59,18.2 v1(31.44,18.2)
  BOTTOM w0.102: JC1.17 31.6,14.99 31.7,15.08 31.7,18.06 31.55,18.2 v1(31.44,18.2)
MCSIA-D0N: length 18.1
  TOP w0.102: v1(33.36,20.9) 33.25,20.79 33.25,19.64 32.76,19.14 29.1,19.14 26.93,21.32 26.93,23.71 R5.1
  BOTTOM w0.102: JC1.9 33.2,14.99 33.15,15.03 33.15,20.69 v1(33.36,20.9)
MCSIA-D0P: length 18
  TOP w0.102: R4.1 27.23,23.71 27.23,21.44 27.45,21.23 27.74,21.23 27.95,21.01 27.95,20.72 29.23,19.45 29.53,19.45 29.73,19.65 30.04,19.65 30.24,19.45 30.55,19.45 30.75,19.65 31.05,19.65 31.26,19.45 31.56,19.45 31.77,19.65 32.07,19.65 32.27,19.45 32.63,19.45 32.95,19.77 32.95,20.8 32.85,20.9 v1(32.64,20.9)
  BOTTOM w0.102: JC1.11 32.8,14.99 32.85,15.03 32.85,20.8 32.75,20.9 v1(32.64,20.9)
MCSIA-D1N: length 16
  TOP w0.102: v1(30.96,21) 30.88,20.92 30.88,20.52 30.6,20.24 29.75,20.24 28.2,21.8 28.2,25.87 R7.1
  BOTTOM w0.102: JC1.21 30.8,14.99 30.75,15.03 30.75,15.37 30.47,15.65 30.47,15.65 30.37,15.75 30.37,15.95 30.47,16.05 30.47,16.05 30.75,16.33 30.75,16.79 30.47,17.07 30.47,17.07 30.37,17.17 30.37,17.37 30.47,17.48 30.47,17.48 30.75,17.76 30.75,18.21 30.47,18.49 30.47,18.49 30.37,18.59 30.37,18.8 30.47,18.9 30.47,18.9 30.85,19.28 30.85,20.89 v1(30.96,21)
MCSIA-D1P: length 16
  TOP w0.102: R6.1 28.5,25.87 28.5,24.35 28.71,24.15 28.71,23.84 28.5,23.64 28.5,23.26 28.71,23.06 28.71,22.75 28.5,22.55 28.5,21.92 28.72,21.71 29.01,21.71 29.22,21.49 29.22,21.2 29.88,20.55 30.47,20.55 30.57,20.65 30.57,20.9 30.47,21 v1(30.24,21)
  BOTTOM w0.102: v1(30.24,21) 30.45,21 30.55,20.9 30.55,19.41 30.35,19.2 30.34,19.2 30.06,18.92 30.06,18.47 30.34,18.19 30.35,18.19 30.45,18.09 30.45,17.88 30.35,17.78 30.34,17.78 30.06,17.5 30.06,17.04 30.34,16.77 30.35,16.77 30.45,16.66 30.45,16.46 30.35,16.36 30.34,16.36 30.06,16.08 30.06,15.62 30.34,15.34 30.35,15.34 30.45,15.24 30.45,15.03 30.4,14.99 JC1.23
MCSIA-D2N: length 15.3
  TOP w0.102: v1(34.56,22.7) 34.51,22.65 34.51,22.25 34.2,21.94 30.9,21.94 29.72,23.12 29.72,23.84 R9.1
  BOTTOM w0.102: v1(34.56,22.7) 34.4,22.54 JC1.3
MCSIA-D2P: length 15.2
  TOP w0.102: R8.1 30.03,23.84 30.03,23.25 30.24,23.03 30.53,23.03 30.74,22.82 30.74,22.53 31.03,22.25 31.33,22.25 31.53,22.45 31.84,22.45 32.04,22.25 32.35,22.25 32.55,22.45 32.85,22.45 33.06,22.25 34.07,22.25 34.2,22.38 34.2,22.52 34.03,22.7 v1(33.84,22.7)
  BOTTOM w0.102: v1(33.84,22.7) 33.99,22.7 34.1,22.6 34.1,14.97 34,14.88 JC1.5
MCSIA-D3N: length 15.5
  TOP w0.102: v1(31.04,24.27) 31.25,24.27 31.32,24.35 31.32,25.67 R11.1
  BOTTOM w0.102: v1(31.04,24.27) 31.25,24.27 31.32,24.35 31.32,24.75 31.14,24.92 30.85,24.92 30.66,24.73 30.37,24.73 30.18,24.92 29.87,24.92 29.56,24.61 29.56,24.3 29.76,24.1 29.76,23.79 29.56,23.59 29.56,23.29 29.76,23.08 29.76,22.78 29.56,22.57 29.56,14.85 29.6,14.81 JC1.27
MCSIA-D3P: length 15.6
  TOP w0.102: v1(31.76,24.27) 31.63,24.4 31.63,25.82 R10.1
  BOTTOM w0.102: JC1.29 29.2,14.81 29.25,14.86 29.25,24.73 29.75,25.23 31.27,25.23 31.63,24.87 31.63,24.4 v1(31.76,24.27)
MCSIA-MCLK: length 18.8
  BOTTOM w0.114: JC1.12 32.8,12.6 33.25,13.04 35.61,13.04 35.84,13.26 35.84,22.75 33.24,25.34 R14.2
MCSIA-RESET: length 3.4
  TOP w0.114: RC2.1 40.98,21.98 R33.1 41.01,23.09 R28.1 41.95,23.09 Q3.2
MCSIA-SCK: length 56.7
  TOP w0.114: v1(33.37,10.94) 34.89,12.46 40.08,12.46 46.81,19.19 46.81,26.15 46.12,26.84 43.6,26.84 42.57,27.87 Q1.2 42.44,28.01 R19.1 42.44,29.53 v1(42.13,29.84) ; R25.1 v1(19.68,30.12)
  L3 w0.114: v1(19.68,30.12) 19.68,29.65 19.84,29.48 20.68,29.48 21.75,30.55 24.53,30.55 25.09,29.99 25.81,29.99 26.05,30.23 40.38,30.23 40.76,29.84 v1(42.13,29.84)
  BOTTOM w0.114: v1(33.37,10.94) 33.6,11.17 JC1.8
MCSIA-SDA: length 36.3
  TOP w0.114: R32.1 44.19,32.69 Q2.2 44.98,32.68 R26.1 45.69,32.24 47.3,30.63 47.3,18.99 40.2,11.88 35.12,11.88 v1(34.13,10.89)
  BOTTOM w0.114: v1(34.13,10.89) 34,11.02 JC1.6
S_GND: length 42.5
  BOTTOM w0.508: 19.19,50.92 20.78,49.33 FB11.1 30.23,49.33 31.47,50.57 J2.1 33.35,49.33 42.51,49.33 43.75,50.57 J1.1 ; 19.19,50.92 19.19,50.57 17.95,49.33 8.79,49.33 J4.1 ; 19.19,50.92 J3.1
SS_GND: length 39.4
  TOP w0.508: J1.3 44.37,54.19 34.05,54.19 J2.3 31.99,54.3 30.32,54.3 29.91,53.89 FB12.1 21.47,53.89 J3.3 19.71,54.3 9.6,54.3 J4.3
TP-AAVDD-3V3: length 11.1
  TOP w0.198: U2.28 23.27,36.66 23.13,36.52 23.08,36.52 23.34,36.26 U2.29
  TOP w0.508: FB4.2 17.08,37.46 17.08,35.92 17.44,35.57 19.33,35.57 19.97,36.2 CP4.2 19.97,36.61 C16.1 C15.1 22.51,36.52 23.08,36.52
TP-AVDD-1V2: length 22.1
  TOP w0.198: U2.18 26.07,39.96 v1(26,40.02) ; v1(27.91,39.97) 28.07,39.81 U2.13 ; U2.3 32.07,39.85 v1(31.89,40.02) ; U2.8 30.07,39.89 v1(29.94,40.02)
  TOP w0.508: FB6.2 18.81,41.57 19.24,42 21.02,42 21.95,41.08 CP6.2 v1(22.98,40.63)
  BOTTOM w0.508: C25.1 C24.1 ; C25.1 26.13,40.15 v1(26,40.02) ; C25.1 C21.1 C22.1 22.98,40.64 v1(22.98,40.63) ; C24.1 C23.1 ; C24.1 v1(27.91,39.97) ; v1(29.94,40.02) 30.06,40.15 C23.1 ; C23.1 C26.1 31.97,40.1 v1(31.89,40.02)
TP-AVDD-3V3: length 22.1
  TOP w0.198: U2.6 v1(30.87,40.02) ; U2.21 v1(24.87,40.02) ; U2.11 v1(28.87,40.02) ; U2.16 v1(26.87,40.02)
  TOP w0.508: v1(22.83,38.91) 22.57,38.65 22.28,38.65 CP1.2 21.95,38.78 21.14,37.98 18.83,37.98 17.21,39.59 FB1.2
  BOTTOM w0.508: C6.1 C5.1 30.9,39.99 v1(30.87,40.02) ; C6.1 28.9,39.99 v1(28.87,40.02) ; C6.1 C7.1 ; C7.1 26.89,40 v1(26.87,40.02) ; C7.1 24.86,39.25 C1.1 ; v1(24.87,40.02) 24.83,39.99 C1.1 ; C1.1 23.15,39.23 v1(22.83,38.91)
TP-DVDD-1V2: length 38.3
  TOP w0.198: U2.31 23.42,35.46 23.08,35.13 ; U2.45 24.47,29.32 v1(24.1,28.95) ; U2.82 v1(32.78,36.26)
  TOP w0.508: 23.08,35.13 22.94,35.13 C4.1 22.39,34.58 21.89,34.58 v1(21.83,34.64) 21.8,34.61 C2.1 20.15,34.61 20.09,34.66 20.07,34.66 CP3.2 19.88,34.47 FB3.2
  L3 w0.508: v1(32.72,37.44) 32.11,37.44 31.51,38.04 25.9,38.04 22.5,34.64 v1(21.83,34.64) 21.43,34.64 20.01,33.22 18,33.22 17.47,32.68 17.47,28.31 18.41,27.37 19.88,27.37 20.62,28.11 v1(22.16,28.11)
  BOTTOM w0.508: v1(32.72,37.44) C12.1 32.72,36.32 v1(32.78,36.26) ; v1(24.1,28.95) 24.09,28.94 C3.1 23,28.94 v1(22.16,28.11)
TP-RSTB: length 33.8
  TOP w0.114: v1(44.67,20.16) 44.59,20.08 R31.1 ; v1(23.1,32.02) 23.1,31.58 23.22,31.46 U2.41
  L3 w0.114: v1(44.67,20.16) 44.67,29.24 42.1,31.81 26.23,31.81 25.88,32.16 23.24,32.16 v1(23.1,32.02)
TP-SAD0: length 3
  TOP w0.114: U2.83 34.17,36.66 34.6,37.09 v1(34.93,37.09) 34.99,37.15 R21.2
  BOTTOM w0.114: R21.2 34.99,37.15 v1(34.93,37.09)
TP-SAD1: length 3.2
  TOP w0.114: U2.84 34.04,37.06 v1(34.92,37.94) 35.02,38.04 R22.2
  BOTTOM w0.114: R22.2 35.02,38.04 v1(34.92,37.94)
TP-SCK: length 30
  TOP w0.114: R12.1 v1(20.26,31.67) 19.68,31.67 R25.2 R20.1 ; v1(42.84,26.84) 43.25,26.43 Q1.3
  L3 w0.114: v1(42.84,26.84) 42.84,30.37 41.96,31.25 26.09,31.25 25.68,31.67 v1(20.26,31.67)
TP-SDA: length 26
  TOP w0.114: v1(20.29,30.04) 20.29,29.96 ; 20.29,29.96 19.75,29.43 R27.1 ; 20.29,29.96 20.29,29.86 20.72,29.43 R13.1 ; v1(40.88,30.76) 40.95,30.82 R32.2 42.14,31.84 Q2.3
  L3 w0.114: v1(40.88,30.76) 25.74,30.76 25.33,31.17 20.67,31.17 20.29,30.79 v1(20.29,30.04)
TP-X27MI: length 3.8
  TOP w0.114: R15.2 33.8,27.46 R24.2 34.01,26.9 C48.2 35.82,26.9 OSC1.3
TP-X27MO: length 1.9
  TOP w0.114: R23.1 32.94,25.24 32.96,25.26 R16.2 R24.1
N16649943: length 3
  TOP w0.206: C33.2 31.21,41.66 31.21,41.22 30.45,40.46 30.45,39.72 30.47,39.7 U2.7
N16657022: length 2.9
  TOP w0.206: U2.12 28.47,39.72 28.39,39.8 28.39,41.25 C35.2
N16657104: length 2.7
  TOP w0.206: C39.2 26.41,41.55 26.41,40.19 26.41,40.19 26.41,39.85 26.47,39.8 U2.17
N16657188: length 2.6
  TOP w0.206: U2.22 24.47,39.73 24.35,39.85 C41.2
N16658195: length 2.8
  TOP w0.198: U2.5 31.27,39.7 31.36,39.79 31.36,40.81 31.84,41.29 C34.2
N16659361: length 2.8
  TOP w0.198: U2.10 29.27,39.68 29.3,39.72 29.3,41.27 C37.2
N16660016: length 2.8
  TOP w0.198: C40.2 27.3,41.43 27.3,39.74 27.27,39.72 U2.15
N16660671: length 2.8
  TOP w0.198: U2.20 25.27,39.64 25.47,39.84 25.47,41.71 C42.2
N16669297: length 3.2
  TOP w0.102: R2.2 25.96,27.18 25.96,27.91 26.82,28.77 26.82,29.04 26.87,29.08 U2.51
N16669400: length 3.2
  TOP w0.102: R3.2 25.66,27.18 25.66,28.04 26.51,28.89 26.51,29.04 26.47,29.08 U2.50
N16669492: length 5
  TOP w0.102: R4.2 27.23,25.14 27.23,27.59 27.62,27.98 27.62,29.04 27.67,29.08 U2.53
N16669496: length 5
  TOP w0.102: R5.2 26.93,25.14 26.93,27.72 27.31,28.1 27.31,29.04 27.27,29.08 U2.52
N16669584: length 2.8
  TOP w0.102: R6.2 28.79,27.04 28.5,27.34 28.5,27.67 28.82,27.98 28.82,29.01 28.87,29.06 U2.56
N16669588: length 2.8
  TOP w0.102: U2.55 28.47,29.06 28.51,29.01 28.51,28.11 28.2,27.79 28.2,27.3 R7.2
N16669676: length 4.7
  TOP w0.102: R8.2 30.02,25.28 30.02,29.01 30.07,29.06 U2.59
N16669680: length 4.7
  TOP w0.102: R9.2 29.71,25.27 29.71,29.01 29.67,29.06 U2.58
N16669768: length 3
  TOP w0.102: R10.2 31.55,27.18 31.55,28.43 31.22,28.76 31.22,29.01 31.27,29.06 U2.62
N16669772: length 3
  TOP w0.102: R11.2 31.25,27.18 31.25,28.3 30.91,28.63 30.91,29.01 30.87,29.06 U2.61
N16670000: length 2.9
  TOP w0.114: U2.42 22.14,31.06 C43.1 R12.2
N16670004: length 2.5
  TOP w0.114: U2.43 23.06,30.66 R13.2
N16672838: length 3
  TOP w0.114: U2.65 32.47,29.23 32.45,29.22 32.45,28.87 32.47,28.86 32.47,28.83 32.83,28.47 v1(32.83,28.42) 33.25,28 R15.1
  BOTTOM w0.114: R14.1 33.25,27.7 33.25,28 v1(32.83,28.42)
N16689695: length 1.8
  TOP w0.114: U2.46 24.87,29.16 24.07,28.36 TP2.1
N16690528: length 3.3
  TOP w0.114: R16.1 32.45,27.19 32.45,28.19 32.25,28.39 32.25,28.77 32.24,28.79 32.24,29.04 32.07,29.21 U2.64
N16706462: length 1.8
  TOP w0.114: v1(28.4,11.05) 28.4,10.01 TP1.1
  BOTTOM w0.114: JC1.34 v1(28.4,11.05)
N16706674: length 5.8
  TOP w0.508: FB9.1 20.82,14.18 CC5.2 20.82,11.87 CC4.2
  BOTTOM w0.229: v1(22.14,11.02) 22,11.16 JC1.66 ; JC1.70 21.2,11.1 v1(21.07,10.97) ; v1(21.61,10.98) 21.6,10.99 JC1.68 ; JC1.72 20.8,11.23 v1(20.53,10.97)
  vias: v1(20.53,10.41) v1(21.07,10.41) v1(21.61,10.43) v1(22.14,10.46)
N16706722: length 3.4
  BOTTOM w0.229: JC1.84 18.4,11.27 18.44,11.23 18.44,11.16 18.51,11.1 18.51,11.05 v1(18.54,11.02) ; v1(16.93,10.97) 16.93,11.03 17.03,11.13 17.03,11.16 17.2,11.33 JC1.90 ; v1(17.47,10.97) 17.47,11.07 17.56,11.16 17.56,11.23 17.6,11.27 JC1.88 ; v1(18.01,10.98) 18.01,11.04 18,11.04 JC1.86
  vias: v1(16.93,10.41) v1(17.47,10.41) v1(18.01,10.43) v1(18.54,10.46)
N16706902: length 1.6
  TOP w0.114: v1(25.7,12.67) 25.7,13.23 RC4.2
  BOTTOM w0.114: v1(25.7,12.67) 25.6,12.57 JC1.48
N16707356: length 15
  TOP w0.114: RC2.2 40.1,16.76 36.92,13.58 v1(34.99,13.58)
  BOTTOM w0.114: JC1.16 32,12.5 33.06,13.56 34.97,13.56 v1(34.99,13.58)
N16711536: length 5.5
  TOP w0.114: R30.1 R31.2 ; R31.2 43.24,20.2 Q3.3 ; R31.2 43.12,20.08 C49.1 41.01,20.08 R33.2
N16711748: length 1.6
  TOP w0.114: R29.1 45.69,23.42 45.67,23.43 Q3.1
N16769015: length 2.3
  TOP w0.508: FB13.2 36.29,22.78 C46.2 36.29,24.99 OSC1.4
N16769019: length 5.2
  TOP w0.114: OSC1.1 36.87,26.16 35.53,26.16 35.21,25.84 C47.2 33.96,24.81 R23.2

## Copper pours and planes (outline as drawn; the poured copper is in the pictures)
GND on TOP: 0.51,0.51 0.51,66.46 51.49,66.46 51.49,0.51 ; 4 cut-outs
GND on BOTTOM: 0.51,0.51 0.51,66.46 51.49,66.46 51.49,0.51 ; 1 cut-out
GND on L2GND, L3: 0.51,0.51 0.51,66.46 51.49,66.46 51.49,0.51
VCC-3V3-EXTSYS on TOP: 14.16,38.78 14.16,38.02 14.37,37.81 15.23,37.81 15.38,37.97 15.38,39.95 15.23,40.1 10.56,40.1 9.72,39.26 8.98,39.26 7.89,38.17 7.89,33.47 16.86,24.5 16.86,16.55 16.73,16.43 16.73,15.46 16.75,15.44 17.97,15.44 18.08,15.54 18.08,24.53 15.18,27.43 15.18,28.26 14.49,28.95 13.61,28.95 8.88,33.67 8.88,37.71 9.06,37.89 10.1,37.89 11.29,39.08 13.86,39.08
VCC-5V on TOP: 19.47,17.09 21.58,17.09 21.78,16.88 21.78,15.92 21.4,15.54 19.55,15.54 19.17,15.92 19.17,16.78
VCC-5V on TOP: 2.66,34.69 14.6,22.75 14.6,15.94 14.77,15.77 15.74,15.77 16.17,16.2 16.17,24.4 5.27,35.3 5.27,48.3 4.03,49.55 4.03,52.16 7.46,52.16 7.81,51.81 9.54,51.81 10.2,52.47 19.17,52.47 19.8,51.83 21.78,51.83 22.29,52.34 31.66,52.34 32.2,51.81 43.32,51.81 44.26,52.75 44.26,53.66 44.19,53.74 34.51,53.74 33.7,52.93 32.76,52.93 32.05,53.64 30.7,53.64 30.37,53.31 21.53,53.31 20.89,52.67 20.62,52.67 19.47,53.82 9.34,53.82 8.88,53.36 8.14,53.36 7.43,54.07 3.29,54.07 2.66,53.43
VCC-5V on BOTTOM: 19.8,16.88 15.31,16.88 15.05,16.63 15.05,16 15.15,15.89 19.9,15.89 19.93,15.92 19.93,16.76
VDD-PLL-1V2 on TOP: 32.76,29.89 32.76,29.3 32.99,29.08 34.31,29.08 34.59,29.36 34.59,29.69 34.38,29.89
N16706674 on TOP: 20.25,14.45 20.25,10.31 20.43,10.13 22.16,10.13 22.34,10.31 22.34,14.34 21.95,14.73 20.53,14.73
